# Altium PCB flexible-hand-warmer-left.PcbDoc (part 3 of 3)
Units mm, origin at the board's own origin, x right, y up, seen from the top; angles counter-clockwise.
Board outline 135.63 x 180.34 mm, 18 copper layers (F.Cu, F.Mask, B.Cu, B.Mask, F.SilkS, B.SilkS, F.Adhes, B.Adhes, F.Paste, B.Paste, Dwgs.User, Cmts.User, Eco1.User, Eco2.User, Edge.Cuts, Margin, B.CrtYd, F.CrtYd); 2 components, 1 nets, 2 pads, 0 vias.
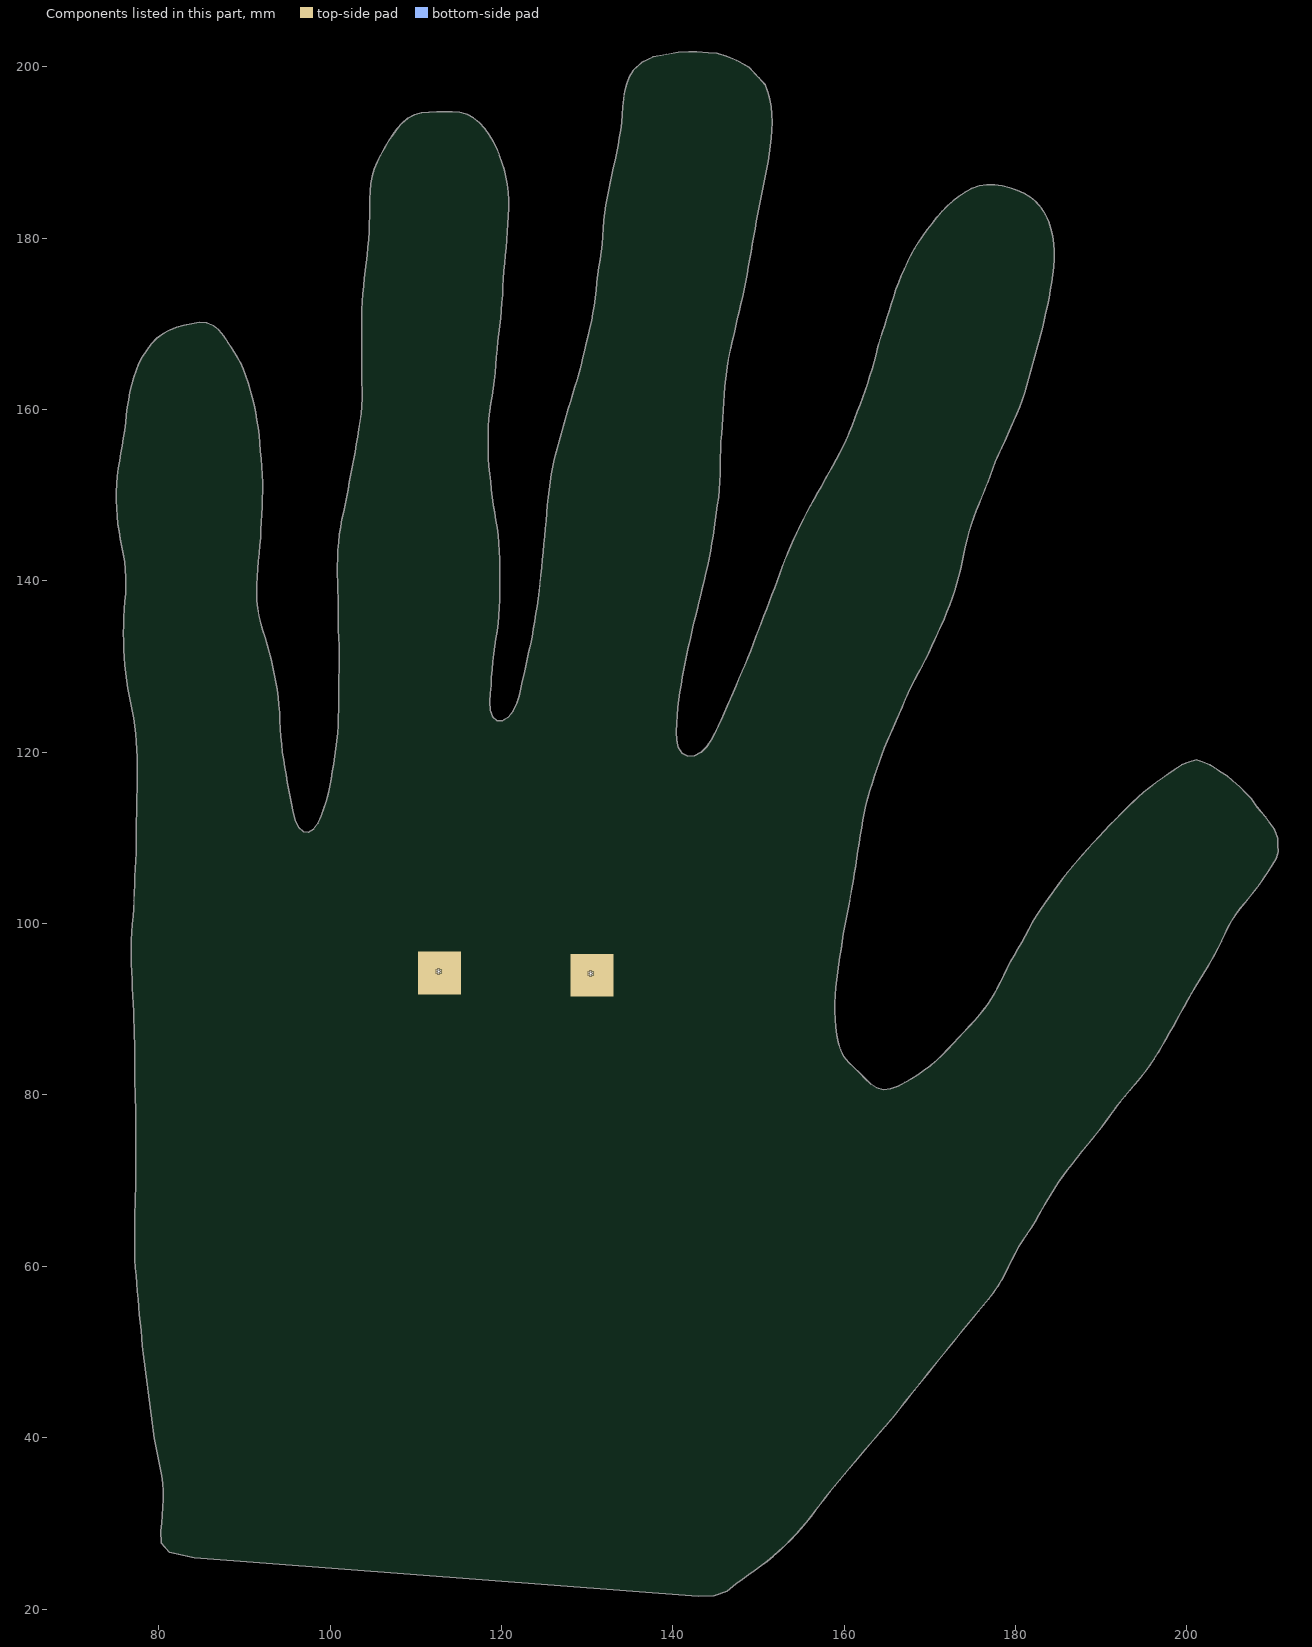
[diagram p5: the components of this part, seen from the top]

## Nets (pads, with @x,y where several pads share a name; then routed paths per layer and width w, separated by ;. In a path a pad name is that pad's centre, name@x,y a point inside that pad or via, vN(x,y) a via of type N, cw(c..) or ccw(c..) an arc to the next point about the centre after c; other vN are vias at no path point) (continued)
copper on no net: | length 1406.6
  Dwgs.User w0.254: 70.04,67.884 117.54,69.384 ; 104.04,87.884 107.54,85.384 ; 105.04,82.384 107.54,85.384 ; 114.04,71.884 117.54,69.384 ; 115.04,66.384 117.54,69.384 ; 122.04,88.884 125.54,86.384 ; 123.04,83.384 125.54,86.384 ; 134.79,100.384 132.29,97.384 ; 135.79,94.884 132.29,97.384 ; 207.04,116.884 132.29,97.384 ; 107.54,85.384 70.04,99.384 125.54,86.384 ; 109.04,61.384 133.04,61.384 133.04,77.384 109.04,77.384 109.04,61.384 ; 109.54,90.884 133.54,90.884 133.54,106.884 109.54,106.884 109.54,90.884
  Edge.Cuts w0.254: 75.04,150.384 75.085,151.32 75.152,152.238 75.257,153.141 75.408,154.025 75.567,154.905 75.709,155.792 75.864,156.674 76.002,157.563 76.11,158.465 76.212,159.369 76.327,160.268 76.461,161.158 76.618,162.04 76.824,162.9 77.066,163.746 77.339,164.58 77.667,165.39 78.075,166.167 78.57,166.914 79.124,167.658 79.76,168.325 80.479,168.862 81.247,169.29 82.071,169.594 82.932,169.826 83.824,170.03 84.725,170.181 85.576,170.13 86.348,169.821 87.008,169.296 87.567,168.584 88.064,167.812 88.564,167.06 89.053,166.316 89.479,165.546 89.852,164.754 90.168,163.939 90.432,163.102 90.677,162.257 90.911,161.408 91.109,160.544 91.287,159.671 91.446,158.791 91.584,157.902 91.698,157.003 91.779,156.09 91.859,155.177 91.935,154.262 92.005,153.345 92.058,152.42 92.107,151.487 92.099,150.549 92.064,149.603 92.042,148.674 92.002,147.767 91.962,146.865 91.918,145.965 91.866,145.06 91.784,144.153 91.695,143.236 91.625,142.319 91.552,141.403 91.484,140.477 91.439,139.551 91.413,138.621 91.436,137.702 91.522,136.805 91.689,135.926 91.91,135.067 92.148,134.219 92.405,133.379 92.644,132.532 92.876,131.682 93.094,130.826 93.299,129.965 93.484,129.095 93.643,128.215 93.793,127.331 93.914,126.435 94.013,125.529 94.089,124.615 94.141,123.69 94.179,122.76 94.235,121.836 94.319,120.925 94.424,120.022 94.553,119.13 94.705,118.246 94.855,117.362 95.012,116.481 95.177,115.603 95.345,114.726 95.516,113.851 95.689,112.962 95.929,112.042 96.33,111.239 96.863,110.744 97.46,110.675 98.06,111.032 98.578,111.728 98.958,112.588 99.259,113.44 99.529,114.278 99.757,115.129 99.947,115.997 100.108,116.876 100.264,117.758 100.412,118.643 100.547,119.533 100.673,120.427 100.791,121.325 100.882,122.233 100.928,123.16 100.958,124.094 100.992,125.034 101.001,125.966 100.995,126.893 101.001,127.809 101.014,128.722 101.034,129.646 101.051,130.579 101.069,131.51 101.051,132.439 101.011,133.381 100.964,134.31 100.935,135.23 100.94,136.155 100.936,137.071 100.917,137.984 100.898,138.905 100.872,139.842 100.837,140.783 100.844,141.72 100.871,142.663 100.91,143.593 100.97,144.514 101.076,145.417 101.207,146.309 101.37,147.187 101.557,148.056 101.745,148.924 101.921,149.798 102.083,150.677 102.252,151.553 102.421,152.429 102.585,153.308 102.739,154.19 102.909,155.066 103.055,155.952 103.199,156.838 103.347,157.723 103.48,158.615 103.601,159.518 103.681,160.425 103.733,161.33 103.734,162.249 103.713,163.176 103.698,164.106 103.676,165.051 103.685,166.001 103.685,167.894 103.684,168.84 103.676,169.79 103.685,170.733 103.709,171.669 103.75,172.598 103.814,173.518 103.902,174.428 103.992,175.337 104.091,176.242 104.208,177.139 104.319,178.04 104.404,178.951 104.486,179.863 104.551,180.782 104.587,181.714 104.613,182.649 104.62,183.593 104.626,184.536 104.654,185.471 104.742,186.381 104.909,187.258 105.162,188.099 105.491,188.909 105.878,189.695 106.297,190.468 106.747,191.228 107.236,191.974 107.773,192.728 108.373,193.443 109.054,194.017 109.823,194.413 110.657,194.65 111.535,194.742 112.44,194.755 113.351,194.784 114.256,194.799 115.133,194.708 115.955,194.461 116.727,194.05 117.427,193.48 118.046,192.8 118.577,192.06 119.044,191.295 119.439,190.512 119.759,189.699 120.048,188.872 120.297,188.029 120.516,187.173 120.67,186.291 120.784,185.384 120.829,184.467 120.825,183.533 120.779,182.606 120.719,181.677 120.668,180.752 120.608,179.83 120.543,178.911 120.457,178 120.378,177.087 120.285,176.179 120.217,175.261 120.161,174.338 120.114,173.411 120.044,172.494 119.972,171.578 119.884,170.668 119.783,169.764 119.67,168.864 119.571,167.959 119.495,167.044 119.401,166.137 119.34,165.216 119.266,164.3 119.173,163.392 119.052,162.496 118.914,161.607 118.759,160.725 118.615,159.839 118.53,158.928 118.468,157.999 118.438,157.071 118.43,156.141 118.441,155.221 118.473,154.313 118.535,153.406 118.628,152.497 118.716,151.583 118.805,150.673 118.909,149.77 119.037,148.877 119.181,147.99 119.328,147.105 119.481,146.222 119.609,145.329 119.695,144.418 119.752,143.495 119.779,142.56 119.781,141.615 119.771,140.665 119.778,139.716 119.778,138.77 119.768,137.827 119.737,136.894 119.682,135.97 119.595,135.06 119.485,134.16 119.348,133.27 119.205,132.383 119.083,131.487 118.987,130.581 118.901,129.67 118.829,128.754 118.776,127.829 118.701,126.892 118.63,125.908 118.685,124.917 118.967,124.113 119.457,123.678 120.109,123.685 120.809,124.117 121.389,124.858 121.777,125.713 122.05,126.562 122.268,127.418 122.446,128.291 122.626,129.163 122.818,130.029 123.008,130.897 123.204,131.762 123.396,132.629 123.568,133.504 123.721,134.387 123.867,135.272 124.019,136.156 124.152,137.047 124.286,137.938 124.396,138.838 124.49,139.745 124.592,140.65 124.678,141.56 124.766,142.47 124.845,143.383 124.937,144.291 125.019,145.204 125.098,146.117 125.192,147.025 125.272,147.938 125.361,148.847 125.463,149.751 125.58,150.649 125.697,151.547 125.827,152.439 125.977,153.323 126.152,154.197 126.369,155.053 126.596,155.906 126.833,156.754 127.08,157.597 127.318,158.445 127.562,159.29 127.809,160.134 128.061,160.976 128.314,161.818 128.568,162.658 128.828,163.497 129.071,164.342 129.299,165.194 129.505,166.055 129.702,166.92 129.907,167.781 130.11,168.643 130.315,169.505 130.506,170.372 130.674,171.249 130.821,172.134 130.945,173.029 131.047,173.933 131.141,174.84 131.255,175.739 131.372,176.637 131.501,177.53 131.629,178.423 131.728,179.328 131.794,180.247 131.859,181.166 131.948,182.075 132.051,182.979 132.186,183.869 132.343,184.75 132.513,185.627 132.68,186.504 132.859,187.376 133.049,188.243 133.248,189.107 133.43,189.978 133.605,190.852 133.753,191.736 133.9,192.622 134.024,193.517 134.104,194.43 134.168,195.349 134.238,196.267 134.37,197.158 134.596,198.011 134.928,198.829 135.365,199.602 136.409,200.546 137.679,201.164 139.229,201.455 140.647,201.712 141.838,201.802 142.784,201.802 144.111,201.659 145.144,201.604 146.273,201.254 147.479,200.751 148.877,199.975 150.062,198.715 150.772,197.92 151.071,197.097 151.304,196.247 151.477,195.365 151.559,194.462 151.589,193.538 151.557,192.605 151.487,191.68 151.382,190.773 151.261,189.877 151.118,188.99 150.948,188.114 150.782,187.237 150.613,186.361 150.435,185.488 150.253,184.617 150.082,183.742 149.912,182.866 149.743,181.99 149.593,181.106 149.436,180.224 149.282,179.342 149.132,178.458 148.973,177.578 148.814,176.697 148.658,175.815 148.505,174.933 148.328,174.06 148.144,173.19 147.947,172.325 147.739,171.465 147.539,170.602 147.353,169.732 147.152,168.87 146.934,168.014 146.737,167.149 146.553,166.279 146.397,165.397 146.271,164.503 146.156,163.605 146.052,162.701 145.974,161.788 145.918,160.864 145.866,159.94 145.824,159.011 145.759,158.092 145.678,157.179 145.613,156.26 145.571,155.331 145.559,154.39 145.559,153.443 145.539,152.506 145.498,151.576 145.425,150.66 145.331,149.753 145.209,148.857 145.09,147.96 144.958,147.068 144.819,146.18 144.695,145.285 144.553,144.398 144.408,143.511 144.239,142.635 144.049,141.768 143.844,140.906 143.647,140.042 143.447,139.179 143.228,138.323 143.02,137.463 142.82,136.599 142.602,135.743 142.4,134.881 142.197,134.019 142.005,133.152 141.807,132.288 141.621,131.419 141.448,130.544 141.28,129.667 141.123,128.786 140.971,127.903 140.82,127.019 140.679,126.131 140.569,125.231 140.494,124.316 140.441,123.373 140.395,122.401 140.434,121.432 140.645,120.543 141.086,119.871 141.751,119.534 142.548,119.588 143.31,119.998 143.944,120.65 144.464,121.416 144.895,122.203 145.272,123.001 145.64,123.794 146.006,124.589 146.357,125.39 146.699,126.194 147.043,126.998 147.375,127.807 147.717,128.611 148.07,129.411 148.419,130.213 148.759,131.018 149.072,131.835 149.375,132.656 149.679,133.476 149.998,134.29 150.312,135.106 150.618,135.926 150.935,136.741 151.243,137.559 151.559,138.375 151.877,139.189 152.187,140.007 152.484,140.83 152.777,141.655 153.087,142.473 153.411,143.285 153.759,144.087 154.118,144.885 154.49,145.677 154.862,146.469 155.25,147.255 155.656,148.032 156.072,148.806 156.502,149.575 156.931,150.343 157.361,151.111 157.789,151.88 158.224,152.646 158.652,153.415 159.07,154.189 159.493,154.959 159.893,155.74 160.263,156.533 160.601,157.339 160.923,158.152 161.229,158.971 161.534,159.791 161.855,160.605 162.159,161.425 162.448,162.251 162.729,163.081 163.005,163.913 163.257,164.755 163.493,165.603 163.72,166.456 163.938,167.311 164.177,168.159 164.434,168.999 164.711,169.83 164.98,170.665 165.236,171.505 165.494,172.344 165.758,173.181 166.036,174.013 166.347,174.83 166.683,175.637 167.034,176.438 167.392,177.236 167.782,178.02 168.206,178.791 168.679,179.541 169.186,180.277 169.71,181.007 170.264,181.732 170.819,182.451 171.408,183.135 172.037,183.778 172.712,184.368 173.414,184.915 174.154,185.412 174.94,185.838 175.765,186.14 176.634,186.268 177.538,186.253 178.447,186.121 179.331,185.904 180.176,185.63 180.989,185.277 181.749,184.809 182.43,184.215 183.019,183.532 183.493,182.774 183.867,181.969 184.132,181.133 184.335,180.265 184.478,179.372 184.541,178.464 184.526,177.556 184.453,176.649 184.342,175.754 184.204,174.857 184.075,173.964 183.926,173.08 183.748,172.207 183.551,171.343 183.361,170.475 183.152,169.616 182.936,168.759 182.714,167.905 182.464,167.062 182.22,166.217 181.986,165.367 181.769,164.511 181.552,163.654 181.318,162.805 181.067,161.963 180.782,161.135 180.479,160.314 180.152,159.503 179.813,158.697 179.464,157.896 179.108,157.097 178.742,156.302 178.365,155.512 178.004,154.716 177.653,153.915 177.331,153.102 177.029,152.281 176.73,151.458 176.416,150.642 176.083,149.834 175.745,149.028 175.41,148.22 175.098,147.403 174.817,146.573 174.567,145.731 174.35,144.874 174.151,144.011 173.965,143.142 173.784,142.27 173.589,141.405 173.375,140.547 173.135,139.7 172.881,138.859 172.598,138.03 172.302,137.207 171.987,136.391 171.655,135.582 171.306,134.78 170.947,133.983 170.589,133.185 170.225,132.39 169.858,131.596 169.478,130.806 169.083,130.024 168.664,129.251 168.242,128.48 167.834,127.703 167.452,126.915 167.1,126.114 166.755,125.311 166.415,124.505 166.066,123.704 165.707,122.906 165.357,122.105 165.016,121.3 164.69,120.489 164.38,119.671 164.089,118.845 163.796,118.02 163.52,117.189 163.251,116.354 162.989,115.516 162.746,114.67 162.538,113.81 162.349,112.942 162.177,112.068 162.023,111.185 161.867,110.303 161.732,109.413 161.608,108.518 161.476,107.626 161.337,106.738 161.195,105.85 161.045,104.967 160.881,104.088 160.734,103.202 160.579,102.321 160.228,100.573 160.061,99.696 159.912,98.812 159.769,97.925 159.633,97.035 159.507,96.141 159.376,95.249 159.247,94.356 159.125,93.461 159.026,92.556 158.957,91.637 158.905,90.703 158.898,89.761 158.933,88.822 159,87.9 159.122,87.004 159.298,86.128 159.569,85.287 159.963,84.512 160.504,83.829 161.148,83.204 161.81,82.564 162.458,81.896 163.109,81.281 163.802,80.823 164.568,80.638 165.41,80.724 166.268,81.039 167.077,81.459 167.846,81.897 168.6,82.366 169.335,82.872 170.051,83.428 170.758,84.019 171.438,84.664 172.088,85.334 172.729,86.003 173.355,86.673 173.974,87.344 174.599,88.019 175.225,88.704 175.826,89.406 176.392,90.118 176.923,90.844 177.397,91.594 177.828,92.362 178.229,93.142 178.609,93.931 178.989,94.72 179.397,95.497 179.832,96.263 180.278,97.024 180.722,97.786 181.147,98.557 181.558,99.333 181.97,100.109 182.415,100.87 182.902,101.615 183.408,102.351 183.926,103.083 184.448,103.813 184.971,104.543 185.506,105.267 186.062,105.983 186.648,106.687 187.241,107.388 187.852,108.081 188.467,108.772 189.092,109.459 189.728,110.142 190.362,110.831 191.004,111.505 191.658,112.169 192.313,112.822 192.962,113.473 193.617,114.125 194.284,114.764 194.965,115.372 195.674,115.933 196.4,116.477 197.133,116.993 197.871,117.494 198.621,118.022 199.39,118.528 200.16,118.844 201.1,119.121 201.794,118.921 202.669,118.552 203.207,118.223 203.791,117.804 204.683,117.269 205.311,116.708 206.188,115.96 206.853,115.287 207.518,114.614 208.2,113.58 209.177,112.468 209.641,111.783 210.187,111.067 210.584,109.978 210.632,109.155 210.667,108.396 210.422,107.614 209.974,106.826 209.474,106.06 208.988,105.309 208.47,104.583 207.931,103.874 207.377,103.177 206.801,102.489 206.226,101.796 205.69,101.078 205.215,100.324 204.788,99.554 204.407,98.766 204.046,97.969 203.647,97.188 203.236,96.412 202.813,95.641 202.363,94.881 201.9,94.127 201.446,93.368 200.986,92.613 200.534,91.854 200.108,91.084 199.683,90.314 199.252,89.546 198.819,88.779 198.387,88.012 197.952,87.246 197.53,86.474 197.088,85.715 196.637,84.953 196.162,84.194 195.652,83.444 195.118,82.704 194.55,81.979 193.971,81.266 193.367,80.572 192.784,79.869 192.204,79.163 191.649,78.446 191.121,77.719 190.589,76.995 190.054,76.27 189.498,75.548 188.919,74.827 188.328,74.108 187.743,73.389 187.172,72.668 186.603,71.955 186.052,71.238 185.519,70.514 184.997,69.784 184.508,69.041 184.044,68.286 183.596,67.526 183.152,66.759 182.728,65.992 182.287,65.239 181.828,64.496 181.343,63.765 180.854,63.031 180.373,62.289 179.945,61.516 179.551,60.733 179.167,59.946 178.794,59.154 178.369,58.384 177.904,57.631 177.395,56.895 176.844,56.177 176.263,55.472 175.684,54.765 175.097,54.062 174.505,53.361 173.923,52.656 173.35,51.947 172.775,51.239 172.201,50.53 171.637,49.818 171.064,49.109 170.488,48.401 169.922,47.69 169.356,46.978 168.782,46.269 168.206,45.562 167.635,44.852 167.067,44.135 166.521,43.415 165.975,42.711 165.414,42.028 164.83,41.362 164.247,40.693 163.655,40.016 163.062,39.319 162.465,38.618 161.873,37.915 161.284,37.213 160.687,36.514 160.104,35.809 159.521,35.104 158.937,34.4 158.35,33.697 157.791,32.982 157.24,32.264 156.684,31.548 156.138,30.822 155.58,30.115 154.996,29.426 154.395,28.744 153.764,28.075 153.1,27.428 152.417,26.791 151.721,26.174 151.018,25.588 150.299,25.037 149.573,24.507 148.844,23.982 148.11,23.469 147.376,22.956 146.331,22.086 144.811,21.571 142.977,21.463 84.146,26.001 81.238,26.598 80.294,27.686 80.218,29.125 80.33,30.025 80.414,30.937 80.478,31.864 80.516,32.798 80.51,33.734 80.442,34.656 80.324,35.557 80.159,36.436 79.97,37.303 79.786,38.173 79.612,39.048 79.465,39.933 79.34,40.827 79.226,41.726 79.105,42.622 78.988,43.52 78.874,44.42 78.762,45.319 78.656,46.221 78.541,47.12 78.42,48.016 78.303,48.914 78.186,49.812 78.088,50.718 77.998,51.626 77.92,52.54 77.82,53.445 77.727,54.353 77.654,55.269 77.567,56.179 77.493,57.095 77.413,58.007 77.336,58.922 77.256,59.835 77.214,60.764 77.185,61.706 77.163,62.637 77.165,63.565 77.163,64.484 77.158,65.408 77.179,66.332 77.221,67.263 77.251,68.201 77.283,69.134 77.308,70.07 77.318,71.012 77.309,71.962 77.309,74.801 77.314,75.749 77.31,76.699 77.302,77.642 77.279,78.563 77.249,79.471 77.218,80.377 77.196,81.289 77.189,82.217 77.187,83.163 77.199,84.119 77.196,85.065 77.176,86.002 77.144,86.936 77.12,87.872 77.083,88.803 77.046,89.733 77.021,90.669 76.976,91.597 76.923,92.521 76.883,93.451 76.846,94.382 76.787,95.311 76.753,96.241 76.762,97.164 76.795,98.078 76.848,98.999 76.921,99.922 76.985,100.841 77.044,101.763 77.099,102.687 77.146,103.614 77.184,104.544 77.204,105.482 77.248,106.416 77.298,107.34 77.338,108.253 77.349,109.168 77.353,110.085 77.359,111.004 77.367,111.933 77.402,112.868 77.423,113.809 77.43,114.753 77.45,115.698 77.468,116.627 77.475,117.548 77.481,118.472 77.466,119.397 77.421,120.326 77.368,121.255 77.307,122.176 77.197,123.077 77.055,123.964 76.898,124.845 76.714,125.715 76.534,126.587 76.371,127.465 76.236,128.356 76.116,129.253 76.021,130.159 75.951,131.077 75.906,132.004 75.882,132.943 75.871,133.889 75.886,134.837 75.922,135.769 75.98,136.691 76.044,137.61 76.108,138.537 76.147,139.473 76.13,140.409 76.078,141.342 75.998,142.255 75.864,143.145 75.688,144.019 75.515,144.894 75.351,145.772 75.206,146.658 75.119,147.568 75.077,148.497 75.044,149.44 75.04,150.384

## Other copper
Dwgs.User:
  text "Resistive material: STS SUS304 / Thickness: 0.03mm" at 188.14,135.359 h4
  text "Well heated area / (for temperature probe)" at 210.54,109.108 h4
  text "Aproximate location / Can be adjusted" at 16.056,96.291 h4
  text "Non heated area" at 20.477,68.687 h4